# Altium PCB PCB1.PcbDoc (part 2 of 3)
Units mm, origin at the board's own origin, x right, y up, seen from the top; angles counter-clockwise.
Board outline 82.55 x 101.6 mm, 4 copper layers (Top Layer, GND, POWER, Bottom Layer), stack 1.586 mm thick; 125 components, 82 nets, 451 pads, 255 vias.
Unrouted connection lines stored in the file: 4.
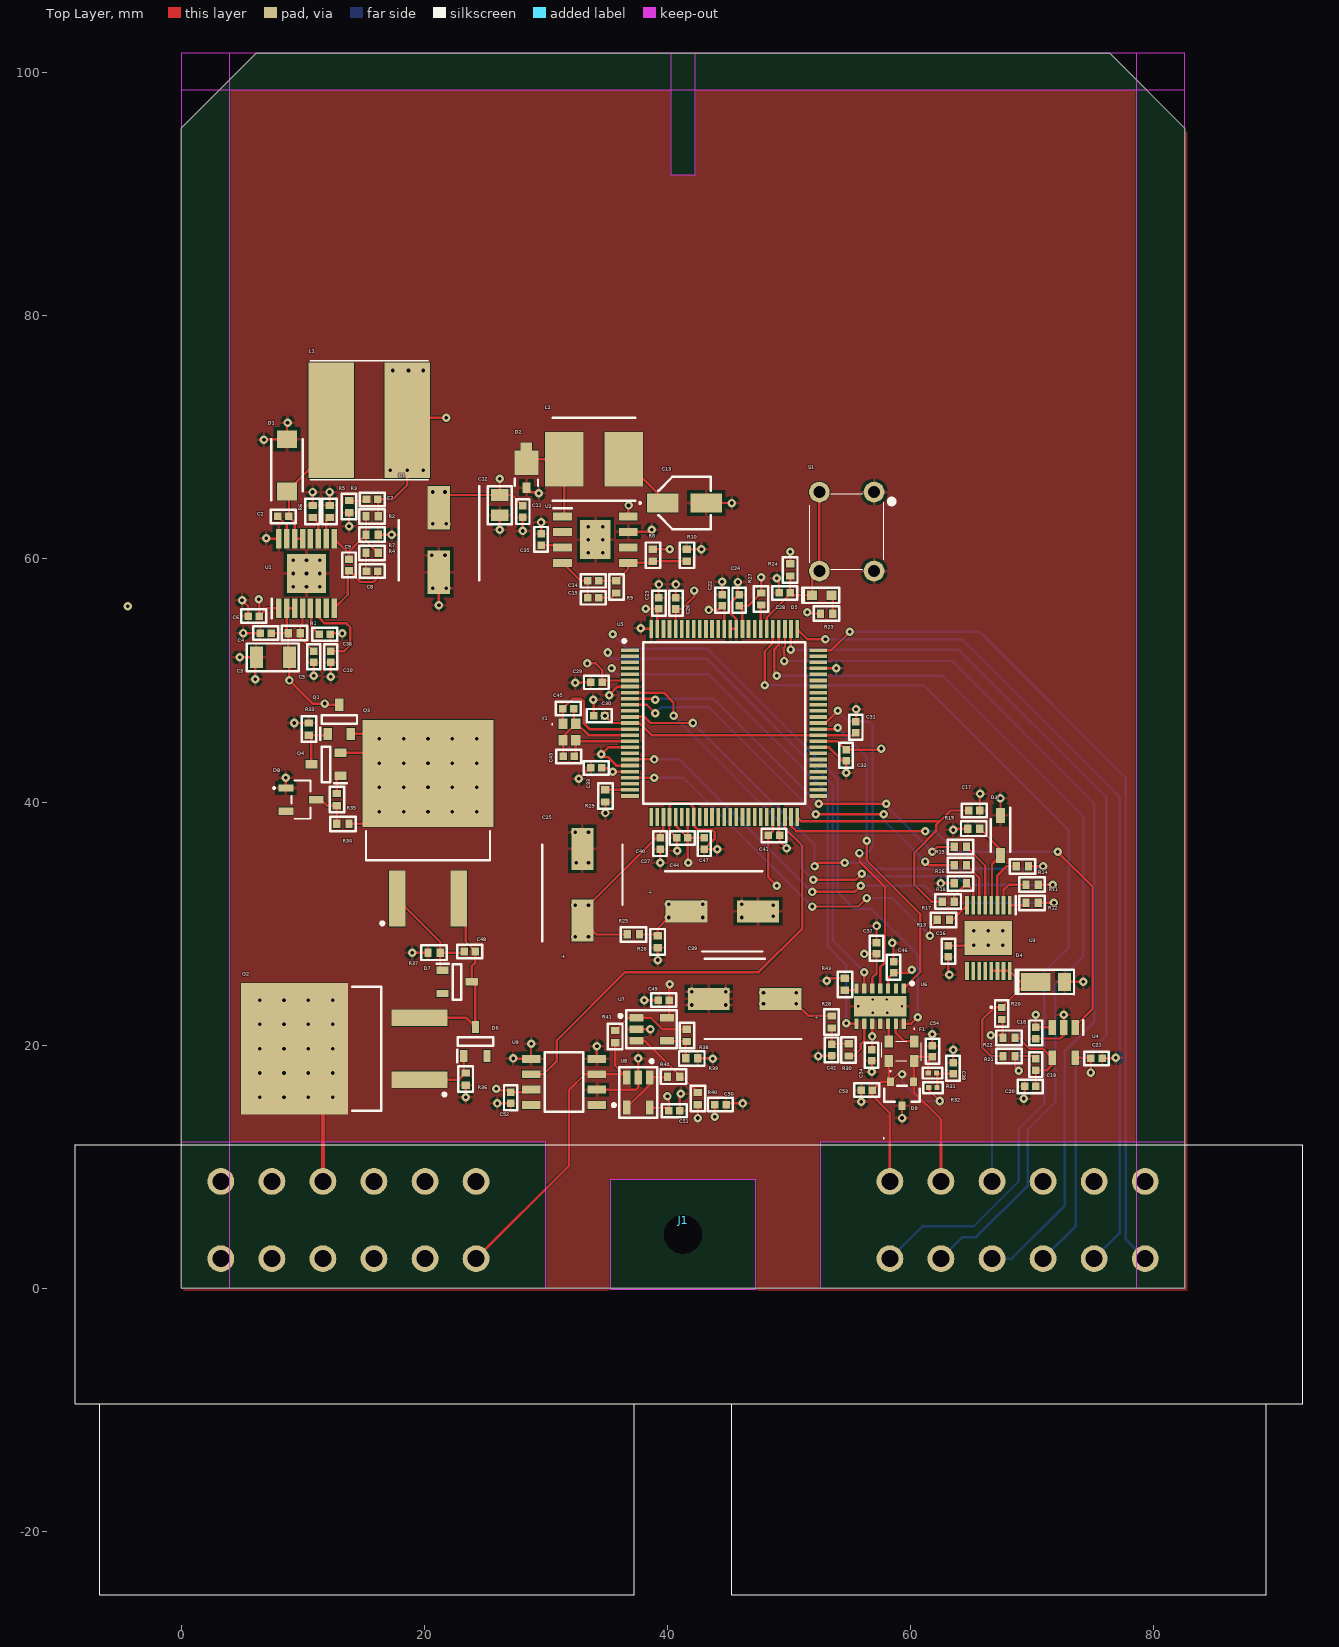
[diagram p0: Top Layer view]

## Part data (continued)
D4: "Rectifier Diode, Schottky, 1 Phase, 1 Element, 1A, 100V V(RRM), Silicon", Case Connection=CATHODE, Forward Voltage=770mV, Manufacturer=Diodes, Max Operating Temperature=175°C, Max Output current=1A, Min Operating Temperature=-55°C, Non-rep Pk Forward Current-Max=40A, Package Body Material=Plastic, Package Shape=Rectangular, Package Style="SMALL OUTLINEMeter", Peak Reflow Temperature (Cel)=260°C, Rep Pk Reverse Voltage-Max=100V, Supplier Part Number=DFLS1100DICT-ND, Time @ Peak Reflow Temperature-Max (s)=40s, Category="Rectifier Diodes", ComponentLink1Description=https://datasheet.ciiva.com:443/pdfs/VipMasterIC/IC/DIOD/DIOD-S-A0001756819/DIOD-S-A0001756819-1.pdf?src-supplier=IHS+Markit, ComponentLink1URL=https://datasheet.ciiva.com:443/pdfs/VipMasterIC/IC/DIOD/DIOD-S-A0001756819/DIOD-S-A0001756819-1.pdf?src-supplier=IHS+Markit, ComponentLink2Description=https://datasheet.ciiva.com/4715/ds30497-81105-4715653.pdf?src-supplier=Mouser, ComponentLink2URL=https://datasheet.ciiva.com/4715/ds30497-81105-4715653.pdf?src-supplier=Mouser, ComponentLink3Description=https://datasheet.ciiva.com/6932/ds30497-6932064.pdf?src-supplier=Newark, ComponentLink3URL=https://datasheet.ciiva.com/6932/ds30497-6932064.pdf?src-supplier=Newark, ComponentLink4Description=https://datasheet.ciiva.com/4245/2460ds30497-4245287.pdf?src-supplier=Arrow+Electronics, ComponentLink4URL=https://datasheet.ciiva.com/4245/2460ds30497-4245287.pdf?src-supplier=Arrow+Electronics, ComponentLink5Description=https://datasheet.ciiva.com/22695/1915475-22695803.pdf?src-supplier=Element14, ComponentLink5URL=https://datasheet.ciiva.com/22695/1915475-22695803.pdf?src-supplier=Element14, ComponentLink6Description=https://datasheet.ciiva.com/7964/ds30497-7964246.pdf?src-supplier=Element14, ComponentLink6URL=https://datasheet.ciiva.com/7964/ds30497-7964246.pdf?src-supplier=Element14, ComponentLink7Description=https://datasheet.ciiva.com/914/ds30497-914548.pdf?src-supplier=Digikey, ComponentLink7URL=https://datasheet.ciiva.com/914/ds30497-914548.pdf?src-supplier=Digikey, ComponentLink8Description=https://datasheet.ciiva.com/914/ds30497-914549.pdf?src-supplier=Digikey, ComponentLink8URL=https://datasheet.ciiva.com/914/ds30497-914549.pdf?src-supplier=Digikey, ComponentLink9Description=https://datasheet.ciiva.com/914/ds30497-914550.pdf?src-supplier=Digikey, ComponentLink9URL=https://datasheet.ciiva.com/914/ds30497-914550.pdf?src-supplier=Digikey, Diode Element Material=SILICON, Diode Type=RECTIFIER, JESD-30 Code=R-PDSO-F2, JESD-609 Code=e3, Manufacturer Part Number=DFLS1100-7, Moisture Sensitivity Level=1, Number of Elements=1, Pins=2, Pricing="1=0.4, 10=0.34, 100=0.2363, 500=0.18452, 1000=0.14998 (USD)", Qualification Status="Not Qualified", Reach SVHC Compliant=No, RoHS=Yes, RoHS Compliant=Yes, Stock=32532, Supplier=Digikey, Surface Mount=Yes, Technology=SCHOTTKY, Terminal Finish=Tin, Terminal Form=Flat, Terminal Position=DUAL
D5: "Single Color LED, Amber, Water Clear, 1.1mm", Manufacturer="Wurth Electronics", Supplier Part Number=732-150060AS75000CT-ND, Category=LEDs, ComponentLink1Description=https://datasheet.ciiva.com:443/pdfs/VipMasterIC/IC/MIDC/MIDC-S-A0007768872/MIDC-S-A0007768872-1.pdf?src-supplier=IHS+Markit, ComponentLink1URL=https://datasheet.ciiva.com:443/pdfs/VipMasterIC/IC/MIDC/MIDC-S-A0007768872/MIDC-S-A0007768872-1.pdf?src-supplier=IHS+Markit, ComponentLink2Description=http://www.farnell.com/datasheets/2621639.pdf?src-supplier=Farnell, ComponentLink2URL=http://www.farnell.com/datasheets/2621639.pdf?src-supplier=Farnell, ComponentLink3Description=http://www.farnell.com/datasheets/2621639.pdf?src-supplier=Element14, ComponentLink3URL=http://www.farnell.com/datasheets/2621639.pdf?src-supplier=Element14, ComponentLink4Description=http://www.farnell.com/datasheets/2621639.pdf?src-supplier=Newark, ComponentLink4URL=http://www.farnell.com/datasheets/2621639.pdf?src-supplier=Newark, Manufacturer Part Number=150060AS75000, Optoelectronic Device Type="SINGLE COLOR LED", Pricing="1=0.15, 50=0.142, 100=0.122, 500=0.105 (USD)", Reach SVHC Compliant=Yes, RoHS=Yes, RoHS Compliant=Yes, Stock=19678, Supplier=Digikey
D6 D7: library part BZX84C12LT1G, "Zener Diode, 12V V(Z), 5.39%, 0.25W, Silicon, Unidirectional, TO-236AB", Manufacturer="ON Semiconductor", Max Operating Temperature=150°C, Max Power Dissipation=250mW, Min Operating Temperature=-65°C, Package Body Material=Plastic, Package Shape=Rectangular, Package Style="SMALL OUTLINEMeter", Peak Reflow Temperature (Cel)=260°C, Reference Voltage-Nom=12V, Supplier Part Number=863-BZX84C12LT1G, Test Current=5mA, Time @ Peak Reflow Temperature-Max (s)=40s, Voltage Tol-Max=5.39%, Additional Feature="UL RECOGNIZED", Category="Zener Diodes", ComponentLink1Description=https://datasheet.ciiva.com:443/pdfs/VipMasterIC/IC/ONSM/ONSM-S-A0002809012/ONSM-S-A0002809012-1.pdf?src-supplier=IHS+Markit, ComponentLink1URL=https://datasheet.ciiva.com:443/pdfs/VipMasterIC/IC/ONSM/ONSM-S-A0002809012/ONSM-S-A0002809012-1.pdf?src-supplier=IHS+Markit, ComponentLink2Description=https://datasheet.ciiva.com/39121/2010827-39121645.pdf?src-supplier=Jameco, ComponentLink2URL=https://datasheet.ciiva.com/39121/2010827-39121645.pdf?src-supplier=Jameco, ComponentLink3Description=https://datasheet.ciiva.com/15141/getdatasheetpartid-38645-15141985.pdf?src-supplier=Verical, ComponentLink3URL=https://datasheet.ciiva.com/15141/getdatasheetpartid-38645-15141985.pdf?src-supplier=Verical, ComponentLink4Description=https://datasheet.ciiva.com/8026/bzx84c2v4lt1-d-8026969.pdf?src-supplier=Element14, ComponentLink4URL=https://datasheet.ciiva.com/8026/bzx84c2v4lt1-d-8026969.pdf?src-supplier=Element14, ComponentLink5Description=https://datasheet.ciiva.com/8026/bzx84c2v4lt1-d-8026970.pdf?src-supplier=Element14, ComponentLink5URL=https://datasheet.ciiva.com/8026/bzx84c2v4lt1-d-8026970.pdf?src-supplier=Element14, ComponentLink6Description=https://datasheet.ciiva.com/18434/70100187-18434894.pdf?src-supplier=Allied+Electronics, ComponentLink6URL=https://datasheet.ciiva.com/18434/70100187-18434894.pdf?src-supplier=Allied+Electronics, ComponentLink7Description=https://datasheet.ciiva.com/8345/bzx84c2v4lt1-d-8345784.pdf?src-supplier=Avnet, ComponentLink7URL=https://datasheet.ciiva.com/8345/bzx84c2v4lt1-d-8345784.pdf?src-supplier=Avnet, ComponentLink8Description=https://datasheet.ciiva.com/8345/bzx84c2v4lt1-d-8345788.pdf?src-supplier=Avnet, ComponentLink8URL=https://datasheet.ciiva.com/8345/bzx84c2v4lt1-d-8345788.pdf?src-supplier=Avnet, ComponentLink9Description=https://datasheet.ciiva.com/894/bzx84c2v4lt1-d-894702.pdf?src-supplier=Digikey, ComponentLink9URL=https://datasheet.ciiva.com/894/bzx84c2v4lt1-d-894702.pdf?src-supplier=Digikey, ComponentLink10Description=https://datasheet.ciiva.com/894/bzx84c2v4lt1-d-894703.pdf?src-supplier=Digikey, ComponentLink10URL=https://datasheet.ciiva.com/894/bzx84c2v4lt1-d-894703.pdf?src-supplier=Digikey, ComponentLink11Description=https://datasheet.ciiva.com/894/bzx84c2v4lt1-d-894701.pdf?src-supplier=Digikey, ComponentLink11URL=https://datasheet.ciiva.com/894/bzx84c2v4lt1-d-894701.pdf?src-supplier=Digikey, Diode Element Material=SILICON, Diode Type=ZENER, Dynamic Impedance-Max=25R, JEDEC-95 Code=TO-236AB, JESD-30 Code=R-PDSO-G3, JESD-609 Code=e3, Manufacturer Part Number=BZX84C12LT1G, Moisture Sensitivity Level=1, Number of Elements=1, Pins=3, Polarity=Unidirectional, Pricing="1=0.1, 10=0.057, 50=0.057, 100=0.027, 1000=0.026, 10000=0.012 (USD)", Qualification Status="Not Qualified", Reach SVHC Compliant=Yes, RoHS=Yes, RoHS Compliant=Yes, Stock=46689, Supplier=Mouser, Surface Mount=Yes, Technology=ZENER, Terminal Finish=Tin, Terminal Form="Gull Wing", Terminal Position=DUAL
D8: library part BZX84B24VLFHT116, "Zener Diode, 24V V(Z), 2.08%, 0.25W, Silicon, Unidirectional"
D9: library part PESD2CANFD36LT-QR, "ESD Protection Diodes / TVS Diodes ESD protection for in-vehicle networks", Manufacturer=Nexperia, Supplier Part Number=771-PESD2CANFD36LTQR, Manufacturer Part Number=PESD2CANFD36LT-QR, Pricing="1=0.31, 10=0.216, 50=0.216, 100=0.09, 1000=0.074, 10000=0.043 (USD)", RoHS=No, Stock=13324, Supplier=Mouser
F1: "Data Line Filter, 2 Function(s), 16V, 0.1A, 4 Pin(s)", Current Rating=100mA, DC Resistance-Max=2R, Insulation Resistance-Min=100MR, Manufacturer=Murata, Max Operating Temperature=85°C, Min Operating Temperature=-40°C, Supplier Part Number=81-DLP31SN121ML2L, Voltage Rating=16V, Category="Common Mode Chokes", Channels=2, ComponentLink1Description=https://datasheet.ciiva.com:443/pdfs/VipMasterIC/IC/MURE/MURE-S-A0008512825/MURE-S-A0008513091-1.pdf?src-supplier=IHS+Markit, ComponentLink1URL=https://datasheet.ciiva.com:443/pdfs/VipMasterIC/IC/MURE/MURE-S-A0008512825/MURE-S-A0008513091-1.pdf?src-supplier=IHS+Markit, ComponentLink2Description=https://datasheet.ciiva.com/11799/0900766b80f15482-11799553.pdf?src-supplier=Rs, ComponentLink2URL=https://datasheet.ciiva.com/11799/0900766b80f15482-11799553.pdf?src-supplier=Rs, ComponentLink3Description=https://datasheet.ciiva.com/25666/l0114s0129dlp31s-25666023.pdf?src-supplier=Future+Electronics, ComponentLink3URL=https://datasheet.ciiva.com/25666/l0114s0129dlp31s-25666023.pdf?src-supplier=Future+Electronics, ComponentLink4Description=https://datasheet.ciiva.com/6214/l0114s0129dlp31s-6214636.pdf?src-supplier=Digikey, ComponentLink4URL=https://datasheet.ciiva.com/6214/l0114s0129dlp31s-6214636.pdf?src-supplier=Digikey, ComponentLink5Description=https://datasheet.ciiva.com/6214/l0114s0129dlp31s-6214639.pdf?src-supplier=Digikey, ComponentLink5URL=https://datasheet.ciiva.com/6214/l0114s0129dlp31s-6214639.pdf?src-supplier=Digikey, ComponentLink6Description=https://datasheet.ciiva.com/3068/l0114s0129dlp31s-3068654.pdf?src-supplier=Avnet, ComponentLink6URL=https://datasheet.ciiva.com/3068/l0114s0129dlp31s-3068654.pdf?src-supplier=Avnet, ComponentLink7Description=https://datasheet.ciiva.com/4942/muratadl-plseries-202927-4942133.pdf?src-supplier=Mouser, ComponentLink7URL=https://datasheet.ciiva.com/4942/muratadl-plseries-202927-4942133.pdf?src-supplier=Mouser, Filter Type="DATA LINE FILTER", Height=1.15mm, JESD-609 Code=e4, Length=3.2mm, Manufacturer Part Number=DLP31SN121ML2L, Mounting Technology="Surface Mount", Output Impedance=120R, Packaging="Tape and Reel", Pricing="1=1.54, 10=1.27, 50=1.07, 100=1.05, 1000=0.985, 10000=0.771 (USD)", Reach SVHC Compliant=Yes, RoHS=Yes, RoHS Compliant=Yes, Stock=3150, Supplier=Mouser, Terminal Finish=Silver, Width=1.6mm
J1: "AMPHENOL SINE/TUCHEL - ATM13-12PA-12PB-BM03 - ATM HEADER  (2) 12 POSITION SIZE 20, A&B KEY  - TIN PLATING 98AC7190", Manufacturer_Name=Amphenol, Mouser Part Number=654-ATM1312A12PBBM03, Arrow Part Number=ATM13-12PA-12PB-BM03, Arrow Price/Stock=https://www.arrow.com/en/products/atm13-12pa-12pb-bm03/amphenol?region=nac, Datasheet Link=http://www.amphenol-sine.com/pdf/datasheet/ATM13-12PA-12PB-BM03.pdf, Geometry.Height=35.4mm, Manufacturer_Part_Number=ATM13-12PA-12PB-BM03, Mouser Price/Stock=https://www.mouser.co.uk/ProductDetail/Amphenol-SINE-Systems/ATM13-12PA-12PB-BM03?qs=9r4v7xj2Lnmhl8rtozcZiQ%3D%3D
L1: library part 744776112, "General Purpose Inductor, 12uH, 20%, 1 Element, Nickel-zinc Ferrite-Core, SMD, 3935", DC Resistance (DCR)=70mR, Inductor Application="POWER INDUCTOR", Inductor Type="GENERAL PURPOSE INDUCTOR", Manufacturer="Wurth Electronics", Max Current Rating=2.72A, Max Operating Temperature=125°C, Min Operating Temperature=-40°C, Self Resonant Frequency=20MHz, Supplier Part Number=710-744776112, Test Frequency=1kHz, Tolerance=20%, Category="Fixed Inductors", Channels=1, ComponentLink1Description=https://datasheet.ciiva.com:443/pdfs/VipMasterIC/IC/MIDC/MIDC-S-A0009028210/MIDC-S-A0009028303-1.pdf?src-supplier=IHS+Markit, ComponentLink1URL=https://datasheet.ciiva.com:443/pdfs/VipMasterIC/IC/MIDC/MIDC-S-A0009028210/MIDC-S-A0009028303-1.pdf?src-supplier=IHS+Markit, ComponentLink2Description=https://datasheet.ciiva.com/1063/744776112-1063302.pdf?src-supplier=Digikey, ComponentLink2URL=https://datasheet.ciiva.com/1063/744776112-1063302.pdf?src-supplier=Digikey, ComponentLink3Description=https://datasheet.ciiva.com/6696/744776112-6696301.pdf?src-supplier=Digikey, ComponentLink3URL=https://datasheet.ciiva.com/6696/744776112-6696301.pdf?src-supplier=Digikey, ComponentLink4Description=https://datasheet.ciiva.com/4954/744776112-37936-4954902.pdf?src-supplier=Mouser, ComponentLink4URL=https://datasheet.ciiva.com/4954/744776112-37936-4954902.pdf?src-supplier=Mouser, ComponentLink5Description=https://datasheet.ciiva.com/7892/1736454-7892919.pdf?src-supplier=Element14, ComponentLink5URL=https://datasheet.ciiva.com/7892/1736454-7892919.pdf?src-supplier=Element14, ComponentLink6Description=https://datasheet.ciiva.com/6696/744776112-6696300.pdf?src-supplier=Digikey, ComponentLink6URL=https://datasheet.ciiva.com/6696/744776112-6696300.pdf?src-supplier=Digikey, Core Material=Ferrite, Inductance-Nom (L)=12uH, JESD-609 Code=e1, Manufacturer Part Number=744776112, Pins=2, Pricing="1=2.29, 10=2.22, 50=2.14, 100=2.1, 1000=1.7, 10000=1.7 (USD)", Reach SVHC Compliant=Yes, RoHS=Yes, RoHS Compliant=Yes, Shape/Size Description="RECTANGULAR PACKAGE", Shielding=Unshielded, Stock=180, Supplier=Mouser, Surface Mount=Yes, Terminal Finish=Copper, Terminal Placement="Dual Ended", Termination="One Surface"
L2: library part SRR6838A-150M, "Power Inductors - SMD Ind,6.8x6.8x3.8mm,15uH+/-20%,2.1A,", Manufacturer=Bourns, Supplier Part Number=652-SRR6838A-150M, Manufacturer Part Number=SRR6838A-150M, Pricing="1=1.28, 10=0.992, 50=0.992, 100=0.851, 1000=0.723, 10000=0.695 (USD)", RoHS=No, Stock=987, Supplier=Mouser
Q1 Q4: "Small Signal Bipolar Transistor, 0.6A I(C), 150V V(BR)CEO, 1-Element, PNP, Silicon, TO-236", Collector-emitter Voltage-Max=150V, DC Current Gain-Min (hFE)=50, Frequency=100MHz, Manufacturer=Diotec, Max Collector Current=600mA, Max Operating Temperature=150°C, Package Body Material=Plastic, Package Shape=Rectangular, Package Style="SMALL OUTLINEMeter", Peak Reflow Temperature (Cel)=260°C, Supplier Part Number=637-MMBT5401, Category=BJTs, ComponentLink1Description=https://datasheet.ciiva.com:443/pdfs/VipMasterIC/IC/DISE/DISE-S-A0006087454/DISE-S-A0006087454-1.pdf?src-supplier=IHS+Markit, ComponentLink1URL=https://datasheet.ciiva.com:443/pdfs/VipMasterIC/IC/DISE/DISE-S-A0006087454/DISE-S-A0006087454-1.pdf?src-supplier=IHS+Markit, ComponentLink2Description=http://datasheet.octopart.com/MMBT5401-Diotec-datasheet-20771873.pdf?src-supplier=Mouser, ComponentLink2URL=http://datasheet.octopart.com/MMBT5401-Diotec-datasheet-20771873.pdf?src-supplier=Mouser, ComponentLink3Description=http://datasheet.octopart.com/MMBT5401-Diotec-datasheet-20771873.pdf?src-supplier=Distrelec, ComponentLink3URL=http://datasheet.octopart.com/MMBT5401-Diotec-datasheet-20771873.pdf?src-supplier=Distrelec, ComponentLink4Description=http://datasheet.octopart.com/MMBT5401-Diotec-datasheet-20771873.pdf?src-supplier=Arrow+Electronics, ComponentLink4URL=http://datasheet.octopart.com/MMBT5401-Diotec-datasheet-20771873.pdf?src-supplier=Arrow+Electronics, ComponentLink5Description=http://datasheet.octopart.com/MMBT5401-Diotec-datasheet-20771873.pdf?src-supplier=Verical, ComponentLink5URL=http://datasheet.octopart.com/MMBT5401-Diotec-datasheet-20771873.pdf?src-supplier=Verical, ComponentLink6Description=http://datasheet.octopart.com/MMBT5401-Diotec-datasheet-20771873.pdf?src-supplier=Onlinecomponents.com, ComponentLink6URL=http://datasheet.octopart.com/MMBT5401-Diotec-datasheet-20771873.pdf?src-supplier=Onlinecomponents.com, ComponentLink7Description=http://datasheet.octopart.com/MMBT5401-Diotec-datasheet-20771873.pdf?src-supplier=LCSC, ComponentLink7URL=http://datasheet.octopart.com/MMBT5401-Diotec-datasheet-20771873.pdf?src-supplier=LCSC, ComponentLink8Description=https://datasheet.octopart.com/MMBT5401-Diotec-datasheet-116330324.pdf?src-supplier=TME, ComponentLink8URL=https://datasheet.octopart.com/MMBT5401-Diotec-datasheet-116330324.pdf?src-supplier=TME, ComponentLink9Description=http://datasheet.octopart.com/MMBT5401-Diotec-datasheet-20771873.pdf?src-supplier=ComS.I.T., ComponentLink9URL=http://datasheet.octopart.com/MMBT5401-Diotec-datasheet-20771873.pdf?src-supplier=ComS.I.T., ComponentLink10Description=http://datasheet.octopart.com/MMBT5401-Diotec-datasheet-20771873.pdf?src-supplier=DComponents, ComponentLink10URL=http://datasheet.octopart.com/MMBT5401-Diotec-datasheet-20771873.pdf?src-supplier=DComponents, ComponentLink11Description=http://datasheet.octopart.com/MMBT5401-Diotec-datasheet-20771873.pdf?src-supplier=Electro+Sonic, ComponentLink11URL=http://datasheet.octopart.com/MMBT5401-Diotec-datasheet-20771873.pdf?src-supplier=Electro+Sonic, JEDEC-95 Code=TO-236, JESD-30 Code=R-PDSO-G3, Manufacturer Part Number=MMBT5401, Moisture Sensitivity Level=1, Number of Elements=1, Pins=3, Polarity/Channel Type=PNP, Pricing="1=0.12, 10=0.064, 50=0.064, 100=0.042, 1000=0.03, 10000=0.015 (USD)", Qualification Status="Not Qualified", Reach SVHC Compliant=Yes, RoHS=Yes, RoHS Compliant=Yes, Stock=892, Supplier=Mouser, Surface Mount=Yes, Terminal Form="Gull Wing", Terminal Position=DUAL, Transistor Element Material=SILICON
Q2 Q3: library part IRF5210STRLPBF, "Zener Diode, 24V V(Z), 2.08%, 0.25W, Silicon, Unidirectional", Avalanche Energy Rating (Eas)=120mJ, Case Connection=DRAIN, Drain Current-Max (Abs) (ID)=38A, Drain-source On Resistance-Max=60mR, DS Breakdown Voltage-Min=100V, Manufacturer=Infineon, Max Operating Temperature=150°C, Operating Mode="ENHANCEMENT MODE", Package Body Material=Plastic, Package Shape=Rectangular, Package Style="SMALL OUTLINEMeter", Peak Reflow Temperature (Cel)=260°C, Power Dissipation-Max (Abs)=170W, Pulsed Drain Current-Max (IDM)=140A, Supplier Part Number=942-IRF5210STRLPBF, Time @ Peak Reflow Temperature-Max (s)=30s, Category=MOSFETs, ComponentLink1Description=https://datasheet.ciiva.com:443/pdfs/VipMasterIC/IC/IRSD/IRSDS18784/IRSDS18784-1.pdf?src-supplier=IHS+Markit, ComponentLink1URL=https://datasheet.ciiva.com:443/pdfs/VipMasterIC/IC/IRSD/IRSDS18784/IRSDS18784-1.pdf?src-supplier=IHS+Markit, ComponentLink2Description=https://datasheet.ciiva.com:443/pdfs/VipMasterIC/IC/ROHM/ROHM-S-A0007698973/ROHM-S-A0007882604-1.pdf?src-supplier=IHS+Markit, ComponentLink2URL=https://datasheet.ciiva.com:443/pdfs/VipMasterIC/IC/ROHM/ROHM-S-A0007698973/ROHM-S-A0007882604-1.pdf?src-supplier=IHS+Markit, ComponentLink3Description=https://www.rohm.com/datasheet/BZX84B24VLFH/bzx84b24vlfht116-e?src-supplier=Digikey, ComponentLink3URL=https://www.rohm.com/datasheet/BZX84B24VLFH/bzx84b24vlfht116-e?src-supplier=Digikey, Diode Type=ZENER, Drain Current-Max (ID)=38A, FET Technology="METAL-OXIDE SEMICONDUCTOR", JEDEC-95 Code=TO-263AB, JESD-30 Code=R-PSSO-G2, JESD-609 Code=e3, Manufacturer Part Number=IRF5210STRLPBF, Moisture Sensitivity Level=1, Number of Elements=1, Pins=2, Polarity/Channel Type=P-CHANNEL, Pricing="1=3.62, 10=1.73, 50=1.69, 100=1.69, 1000=1.33, 10000=1.33 (USD)", Qualification Status="Not Qualified", Reach SVHC Compliant=No, RoHS=Yes, RoHS Compliant=Yes, Stock=11429, Supplier=Mouser, Surface Mount=Yes, Terminal Finish=Nickel, Terminal Form="Gull Wing", Terminal Position=SINGLE, Transistor Application=SWITCHING, Transistor Element Material=SILICON
R1: library part AC0402JR-7D0RL, "Fixed Resistor, Metal Glaze/thick Film, 0.0625W, 0ohm, Surface Mount, 0402", Manufacturer=Yageo, Supplier Part Number=603-AC0402JR-7D0RL, Category=Resistors, Manufacturer Part Number=AC0402JR-7D0RL, Pricing="1=0.14, 10=0.014, 50=0.014, 100=0.009, 1000=0.008, 10000=0.004 (USD)", RoHS=Yes, Stock=155617, Supplier=Mouser
R2: library part AF0402FR-0743KL, "Fixed Resistor, Metal Glaze/thick Film, 0.0625W, 43000ohm, 50V, 1% +/-Tol, 100ppm/Cel, Surface Mount, 0402", Case/Package=0402, Manufacturer=Yageo, Max Operating Temperature=155°C, Min Operating Temperature=-55°C, Package Height=0.32mm, Package Length=1mm, Package Width=0.5mm, Power=62.5mW, Rated Temperature=70°C, Resistor Type="FIXED RESISTOR", Supplier Part Number=603-AF0402FR-0743KL, Temperature Coefficient (ppm/Cel)=100, Tolerance=1%, Working Voltage=50V, Additional Feature=ANTI-SULFUR, Category="Chip SMD Resistors", ComponentLink1Description=https://datasheet.ciiva.com:443/pdfs/VipMasterIC/IC/YAGO/YAGO-S-A0009016998/YAGO-S-A0009016998-1.pdf?src-supplier=IHS+Markit, ComponentLink1URL=https://datasheet.ciiva.com:443/pdfs/VipMasterIC/IC/YAGO/YAGO-S-A0009016998/YAGO-S-A0009016998-1.pdf?src-supplier=IHS+Markit, ComponentLink2Description=http://www.yageo.com/documents/recent/PYu-AF_51_RoHS_L_5.pdf?src-supplier=Digikey, ComponentLink2URL=http://www.yageo.com/documents/recent/PYu-AF_51_RoHS_L_5.pdf?src-supplier=Digikey, Construction=Rectangular, Manufacturer Part Number=AF0402FR-0743KL, Mounting Technology="Surface Mount", Packaging="Tape and Reel", Pins=2, Pricing="1=0.1, 10=0.022, 50=0.022, 100=0.016, 1000=0.012, 10000=0.006 (USD)", Reach SVHC Compliant=Yes, Reference Standard=AEC-Q200, RoHS=Yes, RoHS Compliant=Yes, Stock=9222, Supplier=Mouser, Termination=Wraparound
R3: library part AT0402DRD071K3L, "Fixed Resistor, Thin Film, 0.0625W, 1300ohm, 50V, 0.5% +/-Tol, 25ppm/Cel, Surface Mount, 0402", Case/Package=0402, Manufacturer=Yageo, Max Operating Temperature=155°C, Min Operating Temperature=-55°C, Package Height=0.3mm, Package Length=1mm, Package Shape=Rectangular, Package Width=0.5mm, Power=62.5mW, Rated Temperature=70°C, Resistor Type="FIXED RESISTOR", Supplier Part Number=603-AT0402DRD071K3L, Temperature Coefficient (ppm/Cel)=25, Tolerance=0.5%, Working Voltage=50V, Additional Feature="HIGH PRECISION", Category="Chip SMD Resistors", ComponentLink1Description=https://datasheet.ciiva.com:443/pdfs/VipMasterIC/IC/YAGO/YAGO-S-A0003527576/YAGO-S-A0003527576-1.pdf?src-supplier=IHS+Markit, ComponentLink1URL=https://datasheet.ciiva.com:443/pdfs/VipMasterIC/IC/YAGO/YAGO-S-A0003527576/YAGO-S-A0003527576-1.pdf?src-supplier=IHS+Markit, ComponentLink2Description=http://www.yageo.com/documents/recent/PYu-AT_51_RoHS_L-3.pdf?src-supplier=Digikey, ComponentLink2URL=http://www.yageo.com/documents/recent/PYu-AT_51_RoHS_L-3.pdf?src-supplier=Digikey, Construction=Chip, Manufacturer Part Number=AT0402DRD071K3L, Mounting Technology="Surface Mount", Packaging="Tape and Reel", Pins=2, Pricing="1=0.14, 10=0.102, 50=0.082, 100=0.073, 1000=0.05, 10000=0.031 (USD)", Reach SVHC Compliant=Yes, Reference Standard=AEC-Q200, RoHS=Yes, RoHS Compliant=Yes, Stock=5742, Supplier=Mouser, Technology="THIN FILM", Termination=Wraparound
R4: library part AC0402FR-072K7L, "Fixed Resistor, Metal Glaze/thick Film, 0.0625W, 2700ohm, 50V, 1% +/-Tol, 100ppm/Cel, Surface Mount, 0402", Case/Package=0402, Manufacturer=Yageo, Max Operating Temperature=155°C, Min Operating Temperature=-55°C, Package Height=0.32mm, Package Length=1mm, Package Shape=Rectangular, Package Width=0.5mm, Power=62.5mW, Rated Temperature=70°C, Resistor Type="FIXED RESISTOR", Supplier Part Number=603-AC0402FR-072K7L, Temperature Coefficient (ppm/Cel)=100, Tolerance=1%, Working Voltage=50V, Additional Feature="LASER TRIMMABLE", Category="Chip SMD Resistors", ComponentLink1Description=https://datasheet.ciiva.com:443/pdfs/VipMasterIC/IC/YAGO/YAGO-S-A0003597364/YAGO-S-A0003597364-1.pdf?src-supplier=IHS+Markit, ComponentLink1URL=https://datasheet.ciiva.com:443/pdfs/VipMasterIC/IC/YAGO/YAGO-S-A0003597364/YAGO-S-A0003597364-1.pdf?src-supplier=IHS+Markit, ComponentLink2Description=https://datasheet.ciiva.com/12576/pyu-ac-51-rohs-l-2-12576316.pdf?src-supplier=Mouser, ComponentLink2URL=https://datasheet.ciiva.com/12576/pyu-ac-51-rohs-l-2-12576316.pdf?src-supplier=Mouser, Construction=Chip, JESD-609 Code=e3, Manufacturer Part Number=AC0402FR-072K7L, Mounting Technology="Surface Mount", Packaging="Tape and Reel", Pins=2, Pricing="1=0.1, 10=0.009, 50=0.009, 100=0.007, 1000=0.005, 10000=0.002 (USD)", Reach SVHC Compliant=Yes, Reference Standard=AEC-Q200, RoHS=Yes, RoHS Compliant=Yes, Stock=89734, Supplier=Mouser, Technology="METAL GLAZE/THICK FILM", Terminal Finish=Nickel, Termination=Wraparound
R5: library part RT0402BRE0751K1L, "Fixed Resistor, Thin Film, 0.0625W, 51100ohm, 50V, 0.1% +/-Tol, 50ppm/Cel, Surface Mount, 0402", Case/Package=0402, Manufacturer=Yageo, Max Operating Temperature=155°C, Min Operating Temperature=-55°C, Package Height=0.3mm, Package Length=1mm, Package Width=0.5mm, Power=62.5mW, Rated Temperature=70°C, Resistor Type="FIXED RESISTOR", Supplier Part Number=603-RT0402BRE0751K1L, Temperature Coefficient (ppm/Cel)=50, Tolerance=0.1%, Working Voltage=50V, Additional Feature="HIGH PRECISION", Category="Chip SMD Resistors", ComponentLink1Description=https://datasheet.ciiva.com:443/pdfs/VipMasterIC/IC/YAGO/YAGO-S-A0008510989/YAGO-S-A0008510989-1.pdf?src-supplier=IHS+Markit, ComponentLink1URL=https://datasheet.ciiva.com:443/pdfs/VipMasterIC/IC/YAGO/YAGO-S-A0008510989/YAGO-S-A0008510989-1.pdf?src-supplier=IHS+Markit, ComponentLink2Description=http://www.yageo.com/documents/recent/PYu-RT_1-to-0.01_RoHS_L_9.pdf?src-supplier=Digikey, ComponentLink2URL=http://www.yageo.com/documents/recent/PYu-RT_1-to-0.01_RoHS_L_9.pdf?src-supplier=Digikey, Construction=Chip, Manufacturer Part Number=RT0402BRE0751K1L, Mounting Technology="Surface Mount", Packaging="Tape and Reel", Pins=2, Pricing="1=0.2, 10=0.144, 50=0.113, 100=0.101, 1000=0.068, 10000=0.045 (USD)", Reach SVHC Compliant=Yes, RoHS=Yes, RoHS Compliant=Yes, Stock=6687, Supplier=Mouser, Technology="THIN FILM", Termination=Wraparound
R6 R25: library part RC0402FR-1330KL, "Fixed Resistor, Metal Glaze/thick Film, 0.0625W, 30000ohm, 50V, 1% +/-Tol, 100ppm/Cel, Surface Mount, 0402", Case/Package=0402, Manufacturer=Yageo, Max Operating Temperature=155°C, Min Operating Temperature=-55°C, Package Height=0.35mm, Package Length=1mm, Package Shape=Rectangular, Package Width=0.5mm, Power=62.5mW, Rated Temperature=70°C, Resistor Type="FIXED RESISTOR", Supplier Part Number=603-RC0402FR-1330KL, Temperature Coefficient (ppm/Cel)=100, Tolerance=1%, Working Voltage=50V, Additional Feature="LASER TRIMMABLE", Category="Chip SMD Resistors", ComponentLink1Description=https://datasheet.ciiva.com:443/pdfs/VipMasterIC/IC/YAGO/YAGO-S-A0008145938/YAGO-S-A0008145938-1.pdf?src-supplier=IHS+Markit, ComponentLink1URL=https://datasheet.ciiva.com:443/pdfs/VipMasterIC/IC/YAGO/YAGO-S-A0008145938/YAGO-S-A0008145938-1.pdf?src-supplier=IHS+Markit, ComponentLink2Description=https://datasheet.ciiva.com/8889/pyu-rc0402-51-rohs-l-6-8889740.pdf?src-supplier=Avnet, ComponentLink2URL=https://datasheet.ciiva.com/8889/pyu-rc0402-51-rohs-l-6-8889740.pdf?src-supplier=Avnet, Construction=Chip, JESD-609 Code=e3, Manufacturer Part Number=RC0402FR-1330KL, Mounting Technology="Surface Mount", Packaging="Tape and Reel", Pins=2, Pricing="1=0.1, 10=0.01, 50=0.01, 100=0.007, 1000=0.006, 10000=0.003 (USD)", Reach SVHC Compliant=Yes, RoHS=Yes, RoHS Compliant=Yes, Stock=104196, Supplier=Mouser, Technology="METAL GLAZE/THICK FILM", Terminal Finish=Nickel, Termination=Wraparound
R7: library part RC0402BR-078K2L, "Fixed Resistor, Metal Glaze/thick Film, 0.0625W, 8200ohm, 50V, 0.1% +/-Tol, 100ppm/Cel, Surface Mount, 0402", Manufacturer=Yageo, Supplier Part Number=603-RC0402BR-078K2L, Manufacturer Part Number=RC0402BR-078K2L, Pricing="1=0.18, 10=0.122, 50=0.098, 100=0.088, 1000=0.059, 10000=0.039 (USD)", Reach SVHC Compliant=Yes, RoHS=Yes, RoHS Compliant=Yes, Stock=8780, Supplier=Mouser
R8 R19: library part RC0402FR-7W4K7L, "Fixed Resistor, Metal Glaze/thick Film, 0.125W, 4700ohm, 50V, 1% +/-Tol, 200ppm/Cel, Surface Mount, 0402", Case/Package=0402, Manufacturer=Yageo, Max Operating Temperature=155°C, Min Operating Temperature=-55°C, Package Height=0.35mm, Package Length=1mm, Package Shape=Rectangular, Package Width=0.5mm, Power=125mW, Rated Temperature=70°C, Resistor Type="FIXED RESISTOR", Supplier Part Number=603-RC0402FR-7W4K7L, Temperature Coefficient (ppm/Cel)=200, Tolerance=1%, Working Voltage=50V, Additional Feature="LASER TRIMMABLE", Category="Chip SMD Resistors", ComponentLink1Description=https://datasheet.ciiva.com:443/pdfs/VipMasterIC/IC/YAGO/YAGO-S-A0008145938/YAGO-S-A0008145938-1.pdf?src-supplier=IHS+Markit, ComponentLink1URL=https://datasheet.ciiva.com:443/pdfs/VipMasterIC/IC/YAGO/YAGO-S-A0008145938/YAGO-S-A0008145938-1.pdf?src-supplier=IHS+Markit, Construction=Chip, JESD-609 Code=e3, Manufacturer Part Number=RC0402FR-7W4K7L, Mounting Technology="Surface Mount", Packaging="Tape and Reel", Pins=2, Pricing="1=0.15, 10=0.015, 50=0.015, 100=0.01, 1000=0.008, 10000=0.003 (USD)", Reach SVHC Compliant=Yes, RoHS=Yes, RoHS Compliant=Yes, Stock=9262, Supplier=Mouser, Technology="METAL GLAZE/THICK FILM", Terminal Finish=Nickel, Termination=Wraparound
R9 R28: library part RC0402FR-7D3K3L, "Fixed Resistor, Metal Glaze/thick Film, 0.0625W, 3300ohm, 50V, 1% +/-Tol, 100ppm/Cel, Surface Mount, 0402", Case/Package=0402, Manufacturer=Yageo, Max Operating Temperature=155°C, Min Operating Temperature=-55°C, Package Height=0.35mm, Package Length=1mm, Package Shape=Rectangular, Package Width=0.5mm, Power=62.5mW, Rated Temperature=70°C, Resistor Type="FIXED RESISTOR", Supplier Part Number=603-RC0402FR-7D3K3L, Temperature Coefficient (ppm/Cel)=100, Tolerance=1%, Working Voltage=50V, Additional Feature="LASER TRIMMABLE", Category=Resistors, Construction=Chip, JESD-609 Code=e3, Manufacturer Part Number=RC0402FR-7D3K3L, Mounting Technology="Surface Mount", Packaging="Tape and Reel", Pins=2, Pricing="1=0.1, 10=0.01, 50=0.01, 100=0.007, 1000=0.006, 10000=0.003 (USD)", Reach SVHC Compliant=Yes, RoHS=Yes, RoHS Compliant=Yes, Stock=400223, Supplier=Mouser, Technology="METAL GLAZE/THICK FILM", Terminal Finish=Nickel, Termination=Wraparound
R10: library part AC0402FR-071K05L, "Fixed Resistor, Metal Glaze/thick Film, 0.0625W, 1050ohm, 50V, 1% +/-Tol, 100ppm/Cel, Surface Mount, 0402", Case/Package=0402, Manufacturer=Yageo, Max Operating Temperature=155°C, Min Operating Temperature=-55°C, Package Height=0.32mm, Package Length=1mm, Package Shape=Rectangular, Package Width=0.5mm, Power=62.5mW, Rated Temperature=70°C, Resistor Type="FIXED RESISTOR", Supplier Part Number=603-AC0402FR-071K05L, Temperature Coefficient (ppm/Cel)=100, Tolerance=1%, Working Voltage=50V, Additional Feature="LASER TRIMMABLE", Category="Chip SMD Resistors", ComponentLink1Description=https://datasheet.ciiva.com:443/pdfs/VipMasterIC/IC/YAGO/YAGO-S-A0003597364/YAGO-S-A0003597364-1.pdf?src-supplier=IHS+Markit, ComponentLink1URL=https://datasheet.ciiva.com:443/pdfs/VipMasterIC/IC/YAGO/YAGO-S-A0003597364/YAGO-S-A0003597364-1.pdf?src-supplier=IHS+Markit, ComponentLink2Description=http://www.yageo.com/NewPortal/yageodocoutput?fileName=/pdf/R-Chip/PYu-AC_51_RoHS_L_6.pdf&src-supplier=Digikey, ComponentLink2URL=http://www.yageo.com/NewPortal/yageodocoutput?fileName=/pdf/R-Chip/PYu-AC_51_RoHS_L_6.pdf&src-supplier=Digikey, Construction=Chip, JESD-609 Code=e3, Manufacturer Part Number=AC0402FR-071K05L, Mounting Technology="Surface Mount", Packaging="Tape and Reel", Pins=2, Pricing="1=0.1, 10=0.005, 50=0.005, 100=0.005, 1000=0.005, 10000=0.002 (USD)", Reach SVHC Compliant=Yes, Reference Standard=AEC-Q200, RoHS=Yes, RoHS Compliant=Yes, Stock=33067, Supplier=Mouser, Technology="METAL GLAZE/THICK FILM", Terminal Finish=Nickel, Termination=Wraparound
R11 R12 R13 R14 R15 R16 R17: library part AC0402JR-7W15KL, "Chip Resistor Automotive Grade Thick Film 0402 15kOhm 5% Paper T/R", Manufacturer=Yageo, Supplier Part Number=603-AC0402JR-7W15KL, Category="Chip SMD Resistors", Manufacturer Part Number=AC0402JR-7W15KL, Pricing="1=0.15, 10=0.015, 50=0.015, 100=0.01, 1000=0.008, 10000=0.003 (USD)", RoHS=No, Stock=9990, Supplier=Mouser
R18 R29 R35: library part RT0402FRE101KL, "Fixed Resistor, Thin Film, 0.0625W, 1000ohm, 50V, 1% +/-Tol, 50ppm/Cel, Surface Mount, 0402", Manufacturer=Yageo, Supplier Part Number=603-RT0402FRE101KL, Category="Chip SMD Resistors", Manufacturer Part Number=RT0402FRE101KL, Pricing="1=0.1, 10=0.026, 50=0.026, 100=0.02, 1000=0.015, 10000=0.01 (USD)", Reach SVHC Compliant=Yes, RoHS=Yes, RoHS Compliant=Yes, Stock=2470, Supplier=Mouser
R20: library part CSS0402FT10L0, "Fixed Resistor, Metal Alloy, 0.33W, 0.01ohm, 1% +/-Tol, 100ppm/Cel, Surface Mount, 0402", Manufacturer="Stackpole Electronics", Supplier Part Number=708-CSS0402FT10L0, Category="Chip SMD Resistors", Manufacturer Part Number=CSS0402FT10L0, Pricing="1=0.44, 10=0.272, 50=0.225, 100=0.187, 1000=0.142, 10000=0.116 (USD)", RoHS=Yes, Stock=3752, Supplier=Mouser
R21 R22: library part RP0402DRD07100RL, "Res, 100R, 0.5%, 0.063W, Thin Film, 0402 Rohs Compliant: Yes", Manufacturer=Yageo, Supplier Part Number=603-RP0402DRD07100RL, Category="Chip SMD Resistors", Manufacturer Part Number=RP0402DRD07100RL, Pricing="1=0.21, 10=0.156, 50=0.122, 100=0.11, 1000=0.073, 10000=0.049 (USD)", RoHS=No, Stock=9231, Supplier=Mouser
R23: library part AC0402FR-7D120RL, "Fixed Resistor, Metal Glaze/thick Film, 0.0625W, 120ohm, 50V, 1% +/-Tol, -100,100ppm/Cel, 0402", Case/Package=0402, Manufacturer=Yageo, Max Operating Temperature=155°C, Min Operating Temperature=-55°C, Package Height=0.32mm, Package Length=1mm, Package Width=0.5mm, Power=62.5mW, Resistor Type="FIXED RESISTOR", Supplier Part Number=603-AC0402FR-7D120RL, Temperature Coefficient (ppm/Cel)=-100,100, Tolerance=1%, Working Voltage=50V, Category="Chip SMD Resistors", ComponentLink1Description=https://datasheet.ciiva.com:443/pdfs/VipMasterIC/IC/YAGO/YAGOS02581/YAGOS02581-1.pdf?src-supplier=IHS+Markit, ComponentLink1URL=https://datasheet.ciiva.com:443/pdfs/VipMasterIC/IC/YAGO/YAGOS02581/YAGOS02581-1.pdf?src-supplier=IHS+Markit, Construction=Chip, JESD-609 Code=e3, Manufacturer Part Number=AC0402FR-7D120RL, Packaging="Tape and Reel", Pins=2, Pricing="1=0.14, 10=0.014, 50=0.014, 100=0.009, 1000=0.008, 10000=0.004 (USD)", Reach SVHC Compliant=Yes, Reference Standard=AEC-Q200, RoHS=Yes, RoHS Compliant=Yes, Series=AC, Stock=13078, Supplier=Mouser, Technology="METAL GLAZE/THICK FILM", Terminal Finish=Nickel
R24 R27 R38 R39 R40 R42 R43: library part RP0402BRD0710KL, "Resistor, 10K, 0.1%, 0.063W, THIN FILM, 0402;", Manufacturer=Yageo, Supplier Part Number=603-RP0402BRD0710KL, Category="Chip SMD Resistors", ComponentLink1Description=https://datasheet.octopart.com/RP0402BRD0710KL-Yageo-datasheet-179178423.pdf?src-supplier=Newark, ComponentLink1URL=https://datasheet.octopart.com/RP0402BRD0710KL-Yageo-datasheet-179178423.pdf?src-supplier=Newark, Manufacturer Part Number=RP0402BRD0710KL, Pricing="1=0.24, 10=0.171, 50=0.134, 100=0.12, 1000=0.092, 10000=0.074 (USD)", RoHS=No, Stock=21771, Supplier=Mouser
R26: library part TNPW040217K2BEED, "Fixed Resistor, Thin Film, 0.063W, 17200ohm, 50V, 0.1% +/-Tol, 25ppm/Cel, Surface Mount, 0402", Case/Package=0402, Manufacturer="Vishay Dale", Manufacturer Series=TNPW, Max Operating Temperature=125°C, Min Operating Temperature=-55°C, Package Shape=Rectangular, Power=63mW, Rated Temperature=70°C, Resistor Type="FIXED RESISTOR", Supplier Part Number=71-TNPW040217K2BEED, Temperature Coefficient (ppm/Cel)=25, Tolerance=0.1%, Working Voltage=50V, Category="Chip SMD Resistors", ComponentLink1Description=https://datasheet.ciiva.com:443/pdfs/VipMasterIC/IC/DALE/DALES05753/DALES05753-1.pdf?src-supplier=IHS+Markit, ComponentLink1URL=https://datasheet.ciiva.com:443/pdfs/VipMasterIC/IC/DALE/DALES05753/DALES05753-1.pdf?src-supplier=IHS+Markit, ComponentLink2Description=http://www.vishay.com/docs/28758/tnpw_e3.pdf?src-supplier=Avnet, ComponentLink2URL=http://www.vishay.com/docs/28758/tnpw_e3.pdf?src-supplier=Avnet, ComponentLink3Description=http://www.vishay.com/docs/28758/tnpw_e3.pdf?src-supplier=Digikey, ComponentLink3URL=http://www.vishay.com/docs/28758/tnpw_e3.pdf?src-supplier=Digikey, ComponentLink4Description=http://www.vishay.com/docs/49252/_dbr_smd_resistor_product_overview_vmn_sg2189_1705.pdf?src-supplier=Digikey, ComponentLink4URL=http://www.vishay.com/docs/49252/_dbr_smd_resistor_product_overview_vmn_sg2189_1705.pdf?src-supplier=Digikey, JESD-609 Code=e3, Manufacturer Part Number=TNPW040217K2BEED, Mounting Technology="Surface Mount", Packaging="Tape and Reel", Pins=2, Pricing="1=0.23, 10=0.192, 50=0.169, 100=0.159, 1000=0.134, 10000=0.113 (USD)", Reach SVHC Compliant=Yes, RoHS=Yes, RoHS Compliant=Yes, Stock=8185, Supplier=Mouser, Technology="THIN FILM", Terminal Finish=Tin, Termination=Wraparound
R30 R41: library part RC0402FR-7D33KL, "Fixed Resistor, Metal Glaze/thick Film, 0.0625W, 33000ohm, 50V, 1% +/-Tol, 100ppm/Cel, Surface Mount, 0402", Manufacturer=Yageo, Supplier Part Number=603-RC0402FR-7D33KL, Category=Resistors, Manufacturer Part Number=RC0402FR-7D33KL, Pricing="1=0.1, 10=0.01, 50=0.01, 100=0.007, 1000=0.006, 10000=0.003 (USD)", RoHS=Yes, Stock=38172, Supplier=Mouser

## Text inside footprints (layer, text, board x,y; h text height)
C25: Top Overlay "+" at 31.6,27.1 h0.3 r90
C27: Top Overlay "+" at 38.4,32.4 h0.3
C39: Top Overlay "+" at 52.45,22.4 h0.3 r180